# Altium PCB ASCII-v2.0.PcbDoc (part 5 of 5)
Units mil, origin at the board's own origin, x right, y up, seen from the top; angles counter-clockwise.
Board outline 1968.5 x 4921.26 mil, 4 copper layers (Top Layer, Layer 1, Layer 2, Bottom Layer), stack 62.45 mil thick; 272 components, 175 nets, 1155 pads, 394 vias.
Unrouted connection lines stored in the file: 146.
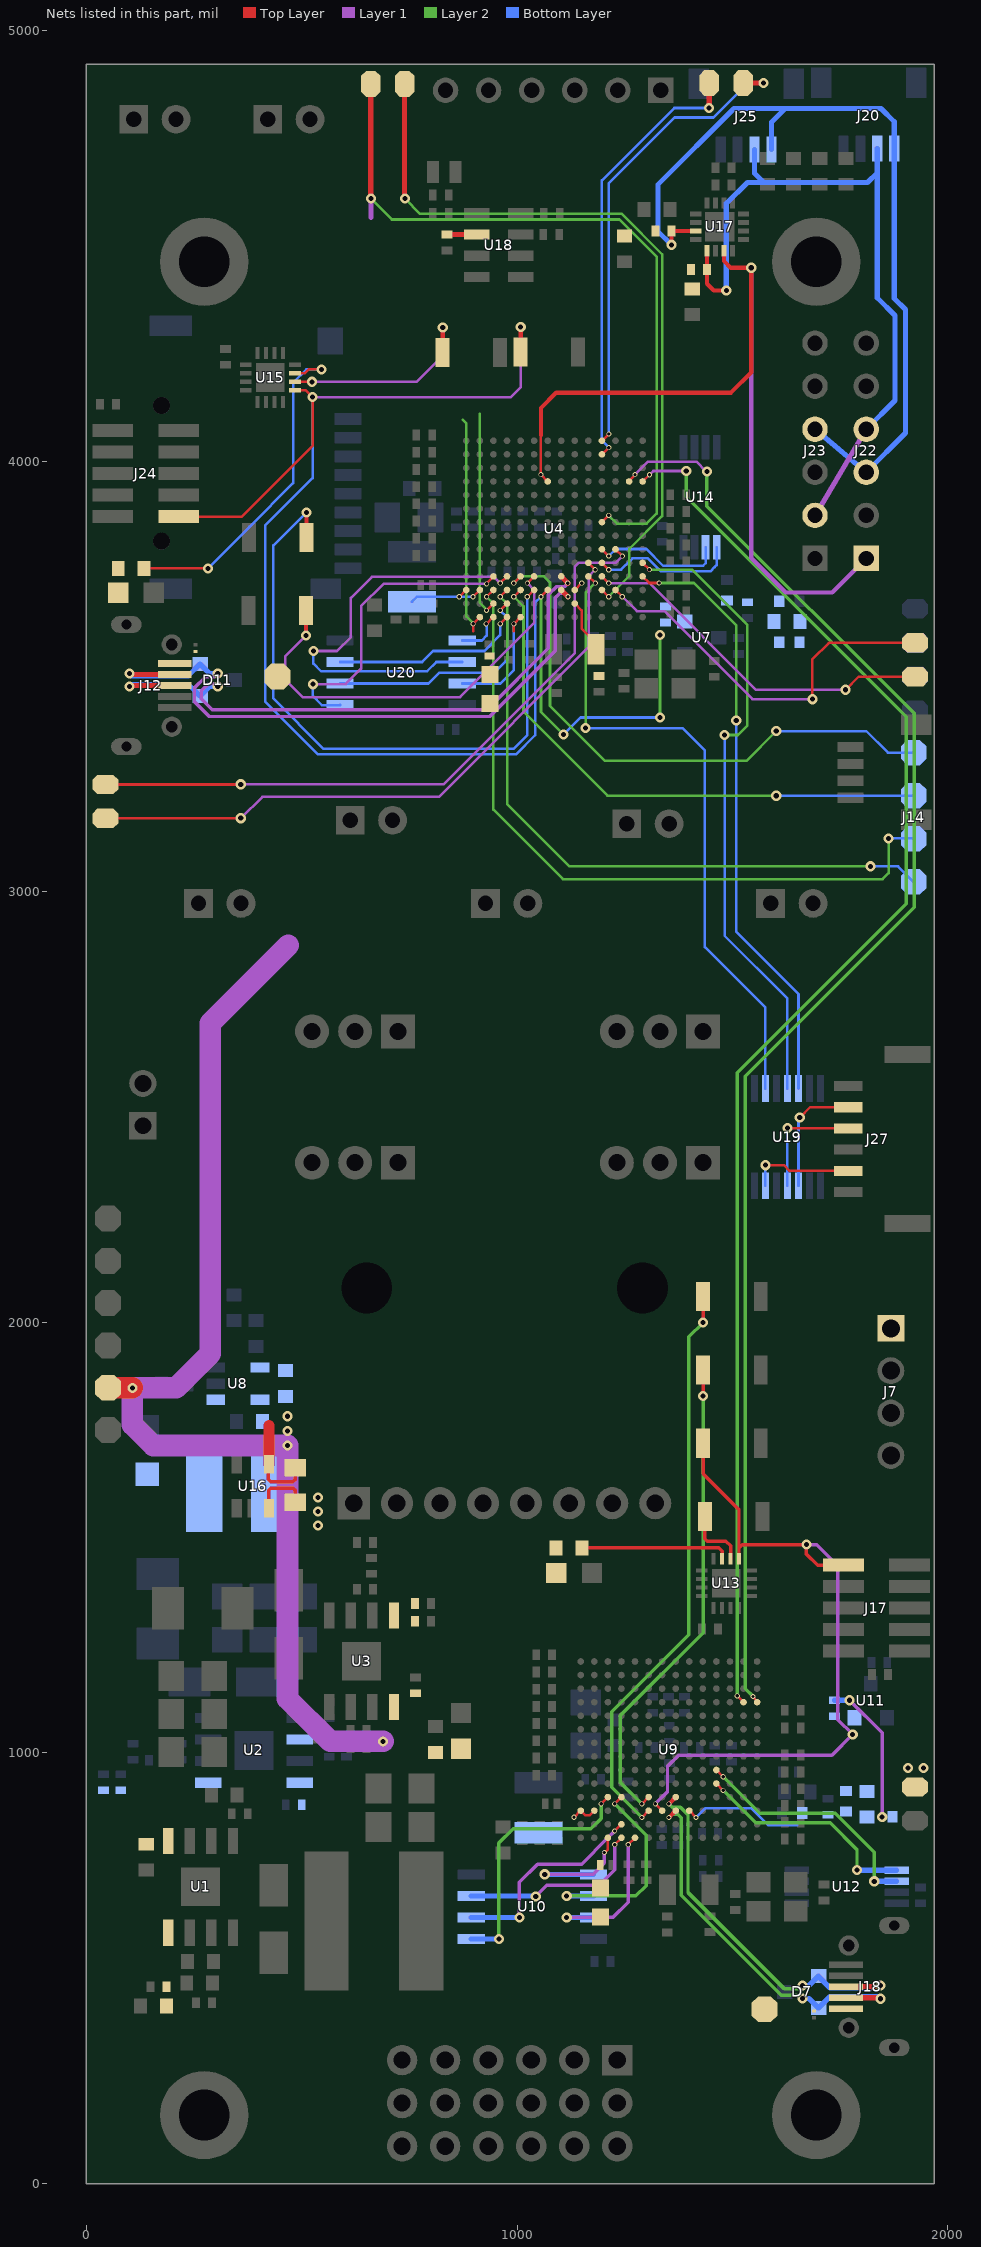
[diagram p5: the nets of this part, all layers, seen from the top]

## Via types
v1: diameter 23.62, hole 11.81, Top Layer to Bottom Layer, tented both sides, 119 vias
v2: diameter 23.62, hole 11.81, Top Layer to Bottom Layer, 104 vias
v3: diameter 11.81, hole 7.87, Top Layer to Bottom Layer, 89 vias
v4: diameter 11.81, hole 7.87, Top Layer to Bottom Layer, tented both sides, 82 vias

## Nets (pads, with @x,y where several pads share a name; then routed paths per layer and width w, separated by ;. In a path a pad name is that pad's centre, name@x,y a point inside that pad or via, vN(x,y) a via of type N, cw(c..) or ccw(c..) an arc to the next point about the centre after c; other vN are vias at no path point) (continued)
NetC125_1: C125.1 U4.N9 X4.1 | length 108.6
  Top Layer w6: U4.N9@1134.22,3669.27 1150,3653.48 1150,3611 X4.1@1181,3580
NetC134_2: C134.2 U18.2 | length 70.5
  Top Layer w12: C134.2@836.5,4527 C134.2@837.28,4526.22 U18.2@906.64,4526.22
NetD5_1: D5.1 L4.2 U8.1
NetF1_2: F1.2 FB1.1
NetF2_2: F2.2 FB3.1
NetL5_2: L5.2 U9.M1 U9.M2 | length 62.7
  Top Layer w6: v4(1132.28,850.69) 1132.48,850.69 1147.82,866.03 U9.M1@1148.02,866.03 1159.06,855 1168.49,855 U9.M2@1179.52,866.03
NetL6_2: L6.2 U4.M1 U4.M2 | length 191.9
  Top Layer w6: v3(865.87,3685.02) 866.19,3685.02 881.93,3700.76 U4.M1@882.25,3700.76 ; v3(897.68,3685.02) 897.84,3685.02 913.59,3700.76 U4.M2@913.74,3700.76
  Bottom Layer w6: L6.2@756.03,3673.65 767.4,3685.02 v3(897.68,3685.02)
NetLED1_1: LED1.1 R1.1
NetLED2_2: LED2.2 R26.2
NetLED3_2: LED3.2 R13.2
NetR2_1: R2.1 R5.2 U2.5
NetR4_2: R4.2 U2.4
NetR6_1: R6.1 R9.2 U3.5
NetR8_2: R8.2 U3.4
NetR13_1: R13.1 U15.11 | length 804.9
  Top Layer w6: R13.1@134,3751 v2(282,3751) ; U15.11@484.09,4203.84 506.84,4203.84 516,4213 v2(545.65,4213)
  Bottom Layer w6: v2(282,3751) 378.38,3847.38 480,3949 480,4182 511,4213 v2(545.65,4213)
NetR14_2: R14.2 SB2.2
NetR15_2: R15.2 SB3.2
NetR17_1: R17.1 R20.2 U1.5
NetR19_2: R19.2 U1.4
NetR26_1: R26.1 U13.11 | length 355.1
  Top Layer w8: R26.1@1150.66,1476 R26.1@1151.66,1477 ; R26.1@1150.66,1477 R26.1@1151.66,1477 ; R26.1@1156.66,1482 R26.1@1151.66,1477 ; U13.11@1476.16,1451.09 1476.16,1468.84 1468,1477 R26.1@1151.66,1477
NetR28_1: R28.1 U8.4
NetSW4_2: SW4.2 U13.10 | length 147.9
  Top Layer w8: SW4.2@1436.07,1549 1436.07,1506.07 1436.07,1497.93 1442,1492 1485,1492 1495.84,1481.16 U13.10@1495.84,1451.09
NetSW8_2: SW8.2 U15.10 | length 492.3
  Top Layer w6: U15.10@484.09,4184.16 v2(523.84,4184.16)
  Top Layer w10: SW8.2@827.57,4252.5 v2(827.57,4310.5)
  Layer 1 w6: v2(523.84,4184.16) 766.84,4184.16 827.57,4244.89 v2(827.57,4310.5)
NetU4_J11: U4.J11 U14.6 | length 309.5
  Top Layer w6: U4.J11@1197.21,3795.25 v3(1212.96,3779.59)
  Bottom Layer w6: v3(1212.96,3779.59) 1213.04,3779.59 1229.45,3796 1300.38,3796 1339.38,3757 1432,3757 1437.8,3762.8 U14.6@1437.8,3799.86
NetU4_K11: U4.K11 U14.5 | length 343.8
  Top Layer w6: U4.K11@1197.21,3763.76 1197.21,3763.61 1212.98,3747.84 v3(1212.98,3747.69)
  Bottom Layer w6: v3(1212.98,3747.69) 1213.3,3748.01 1242.01,3748.01 1268,3774 1304,3774 1334,3744 1449,3744 1459,3754 1463.39,3758.39 U14.5@1463.39,3799.86
NetU4_L3: U4.L3 U20.1 | length 709
  Top Layer w6: v3(929.49,3715.09) 929.49,3715.8 945.24,3731.55 U4.L3@945.24,3732.26
  Layer 1 w6: v2(526,3482) 602,3482 638,3518 638,3663 690.09,3715.09 v3(929.49,3715.09)
  Bottom Layer w6: v2(526,3482) 526,3454 546.52,3433.48 U20.1@589.1,3433.48 U20.1@589.62,3434
NetU4_L4: U4.L4 U20.6 | length 978.2
  Top Layer w6: v3(960.99,3716.51) U4.L4@976.74,3732.26
  Layer 1 w6: v2(527,3559) 582,3559 614,3591 614,3682.15 662.85,3731 946.5,3731 v3(960.99,3716.51)
  Bottom Layer w6: v2(527,3559) 527,3530 545,3512 574,3512 791,3512 812.48,3533.48 U20.6@872.96,3533.48
NetU4_N4: U4.N4 U20.2 | length 554.8
  Top Layer w6: v3(960.99,3653.52) U4.N4@976.74,3669.27
  Bottom Layer w6: U20.2@589.1,3483.48 794.48,3483.48 820,3509 948,3509 976.89,3537.89 976.89,3637.61 v3(960.99,3653.52)
NetU4_P3: U4.P3 U20.5 | length 112.6
  Top Layer w6: v3(928.28,3622.02) 928.89,3622.02 944.64,3637.77 U4.P3@945.24,3637.77
  Bottom Layer w6: U20.5@872.96,3583.48 918.48,3583.48 929.49,3594.49 929.49,3606.87 929.24,3607.12 929.24,3621.07 v3(928.28,3622.02)
NetU4_P4: U4.P4 U20.3 | length 446.1
  Top Layer w6: v3(960.99,3622.02) U4.P4@976.74,3637.77
  Bottom Layer w6: U20.3@589.1,3533.48 779.48,3533.48 805,3559 924,3559 960.99,3595.99 v3(960.99,3622.02)
NetU4_P5: U4.P5 U20.7 | length 279.4
  Top Layer w6: 992.48,3605.09 992.48,3621.71 v3(992.8,3622.02) ; v3@992.48,3622.02 U4.P5@1008.23,3637.77
  Bottom Layer w6: U20.7@872.96,3483.48 961.48,3483.48 992.48,3514.48 992.48,3621.71 v3(992.8,3622.02)
NetU9_J11: U9.J11 U12.6 | length 565.1
  Top Layer w6: U9.J11@1462.98,960.52 v4(1478.73,944.77)
  Layer 2 w8: v4(1478.73,944.77) 1563.5,860.01 1738.99,860.01 1829.5,769.5 v1(1829.5,702.01)
  Bottom Layer w12: v1(1829.5,702.01) U12.6@1881.5,702.01
NetU9_K11: U9.K11 U12.5 | length 529.8
  Top Layer w6: U9.K11@1462.98,929.02 v4(1478.73,913.28)
  Layer 2 w8: v4(1478.73,913.28) 1554.27,837.74 1727.26,837.74 1789.5,775.5 v1(1789.5,728.01)
  Bottom Layer w6: v1(1789.5,728.01) v1@1789.91,727.6
  Bottom Layer w12: v1@1789.91,727.6 U12.5@1881.5,727.6
NetU9_L3: U9.L3 U10.1 | length 604.5
  Top Layer w6: v4(1195.27,881.78) U9.L3@1211.02,897.53
  Layer 2 w8: v1(958,568) 958,791 991,824 1171.36,824 1195.27,847.9 v4(1195.27,881.78)
  Bottom Layer w12: U10.1@893.5,568.01 v1(958,568)
NetU9_L4: U9.L4 U10.6 | length 499
  Top Layer w6: v4(1226.76,881.78) U9.L4@1242.51,897.53
  Layer 2 w8: v1(1115.36,668.01) 1275.99,668.01 1300,692.02 1300,808.54 v4(1226.76,881.78)
  Bottom Layer w12: v1(1115.36,668.01) U10.6@1177.36,668.01
NetU9_N4: U9.N4 U10.2 | length 486.7
  Top Layer w6: v4(1226.76,818.79) U9.N4@1242.51,834.54
  Layer 1 w8: v1(1005.5,618.01) 1005.5,700.01 1047.5,742 1149.98,742 1209.98,802 v4(1226.76,818.79)
  Bottom Layer w12: U10.2@893.5,618.01 v1(1005.5,618.01)
NetU9_P3: U9.P3 U10.5 | length 325.1
  Top Layer w6: v4(1203,769) 1204,769 1211.02,776.02 U9.P3@1211.02,803.04
  Layer 1 w8: v1(1064.33,718.18) 1176.68,718.18 1203,744.5 v4(1203,769)
  Bottom Layer w12: v1(1064.33,718.18) 1064.5,718.01 U10.5@1177.36,718.01
NetU9_P4: U9.P4 U10.3 | length 439.8
  Top Layer w6: v4(1226.92,787.29) 1226.92,787.37 U9.P4@1242.51,803.04 U9.P4@1242.51,803.04
  Layer 1 w8: v1(1043.5,667.01) 1069.5,693.01 1190.5,693.01 1226.76,729.27 1226.76,787.13 v4(1226.92,787.29)
  Bottom Layer w12: U10.3@893.5,668.01 1042.5,668.01 v1(1043.5,667.01)
NetU9_P5: U9.P5 U10.7 | length 375.5
  Top Layer w6: v4(1258.26,787.29) U9.P5@1274.01,803.04
  Layer 1 w8: v1(1115.36,618.01) 1222.5,618.01 1258.26,653.76 v4(1258.26,787.29)
  Bottom Layer w12: v1(1115.36,618.01) U10.7@1177.36,618.01
ON/OFF: SW1.1 U9.M6 | length 1348.6
  Top Layer w6: v4(1289.76,850.28) U9.M6@1305.5,866.03
  Top Layer w8: v1@1432.07,1999.4 SW1.1@1432.07,2060
  Layer 2 w8: v4(1289.76,850.28) 1220,920.04 1220,1095.28 1399,1274.28 1399,1966.33 v1(1432,1999.33)
ON/OFF_1: SW5.1 U4.M6 | length 1517.2
  Top Layer w6: v3(1023.82,3685.02) 1023.9,3685.02 1039.65,3700.76 U4.M6@1039.73,3700.76
  Top Layer w10: SW5.1@511,3823 v2(511,3881)
  Bottom Layer w6: v2(511,3881) 434,3804 434,3449 551,3332 992.23,3332 1023.98,3363.75 1023.98,3684.86 v3(1023.82,3685.02)
RST_MCU: J17.10 R23.2 SW3.1 U9.M7 U11.2 U13.9 | length 1662.8
  Top Layer w6: v4(1321.25,881.78) U9.M7@1337,866.03
  Top Layer w8: SW3.1@1432.07,1719.33 1432.07,1647.93 1515.53,1564.47 1515.53,1476.53 ; U13.9@1515.53,1451.09 1515.53,1476.53 ; J17.10@1757.96,1436.51 1757.45,1436 1698,1436 1672,1462 v1(1672,1484) 1523,1484 1515.53,1476.53
  Layer 1 w8: v4(1321.25,881.78) 1349.5,910.03 1349.5,969.01 1375.51,995.02 1731.51,995.02 v1(1779.5,1043.01) 1745,1077.51 1745,1435 1696,1484 v1(1672,1484)
RST_MCU_1: J24.10 R10.2 SW7.1 U4.M7 U7.2 U15.9 | length 3802.4
  Top Layer w6: J24.10@214.77,3871 361,3871 525.26,4035.26 v2(525.26,4148.74) 509.53,4164.47 U15.9@484.09,4164.47 ; v3(1055.63,3685.02) 1055.63,3685.09 1071.22,3700.69 U4.M7@1071.22,3700.76
  Top Layer w10: SW7.1@1008.5,4253.5 v2(1008.5,4311.5)
  Layer 1 w6: v2(525.26,4148.74) 985.74,4148.74 1009,4172 v2@1009,4311.5
  Layer 2 w6: v3(1055.63,3685.02) 1055.63,3417.37 v2(1108,3365) ; v2(1332,3404.54) v2(1332,3596)
  Bottom Layer w6: v2(525.26,4148.74) 525.26,3960.26 415,3850 415,3442 538,3319 997.62,3319 1042,3363.38 1042,3671.54 1055.48,3685.02 v3(1055.63,3685.02) ; v2(1108,3365) 1147.54,3404.54 v2(1332,3404.54)
RTS: U4.L10 U19.2 | length 1511.2
  Top Layer w6: U4.L10@1165.71,3732.26 1166.03,3732.26 1181.78,3716.51 v3(1182.09,3716.51)
  Layer 2 w6: v2(1159,3380) 1160,3381 1160,3695.05 1181.46,3716.51 v3(1182.09,3716.51)
  Bottom Layer w6: v2(1159,3380) 1384,3380 1436,3328 1436,2871.62 1576.82,2730.8 U19.2@1576.82,2542.99
RTS_5V: J27.2 U19.13 | length 245.6
  Top Layer w6: v2(1577,2365) 1620,2365 1633.14,2351.86 J27.2@1769.04,2351.86
  Bottom Layer w6: U19.13@1576.82,2317.01 1576.82,2364.82 v2(1577,2365)
RX: U4.L14 U19.5 | length 1400.1
  Top Layer w6: U4.L14@1291.7,3732.26 1291.93,3732.26 1307.21,3716.98 v3(1330,3717)
  Layer 2 w6: v3(1330,3717) 1411,3717 1509,3619 v2(1509,3398)
  Bottom Layer w6: v2(1509,3398) 1509,2907.19 1653.59,2762.6 U19.5@1653.59,2542.99
RX0: U4.D14 U9.D13 | length 3350.2
  Top Layer w6: U4.D14@1291.7,3952.73 1291.93,3952.73 1307.53,3968.33 v3(1307.76,3968.33) ; v4(1511.47,1132.5) U9.D13@1525.98,1118
  Layer 1 w6: v3(1307.76,3968.33) 1316.43,3977 v2(1393,3977)
  Layer 2 w8: v2(1393,3977) 1393,3916.8 1903.47,3406.33 1903.47,2971.67 1511.47,2579.67 v4(1511.47,1132.5)
RX1: TP11.2 U4.G11 | length 1776.5
  Top Layer w6: U4.G11@1197.21,3858.24 v3(1212.96,3873.99)
  Top Layer w12: v1@660.26,4609.5 TP11.2@660.26,4876
  Layer 1 w12: 660.76,4566.24 v1(660.76,4609.5)
  Layer 2 w6: v1(660.76,4609.5) 709.26,4561 1238,4561 1324,4475 1324,3877.88 1301.12,3855 1231.95,3855 v3(1212.96,3873.99)
RX1_5V: J27.5 U19.10 | length 280.9
  Top Layer w6: v2(1656.59,2475.59) 1680.5,2499.5 J27.5@1769.04,2499.5
  Bottom Layer w6: U19.10@1653.59,2317.01 v2@1653.59,2475.59
RX2: TP12.2 U4.M12 | length 909.3
  Top Layer w6: U4.M12@1228.7,3700.76 v3(1244.45,3685.02) ; v2(1686,3447.19) 1686,3540 1724,3578 TP12.2@1924.44,3578
  Layer 1 w6: v3(1244.45,3685.02) 1278.07,3651.4 1342.6,3651.4 1546.81,3447.19 v2(1686,3447.19)
RX3: TP13.2 U4.K10 | length 1495.4
  Top Layer w6: TP13.2@44,3170.26 358,3170.26 v2(358.5,3170.76) ; U4.K10@1165.71,3763.76 1165.71,3763.6 1181.46,3747.85 v3(1181.46,3747.69)
  Layer 1 w6: v2(358.5,3170.76) 358.94,3170.76 408.68,3220.5 818.41,3220.5 1166.18,3568.28 1166.18,3691.92 1166.18,3732.42 v3(1181.46,3747.69)
RX4: TP1.2 U4.B11 | length 1026.3
  Top Layer w6: U4.B11@1197.21,4015.72 1197.37,4015.72 1213.11,4031.47 v3(1213.27,4031.47) ; v2(1446,4820) v2@1446.26,4820.26
  Top Layer w12: v2@1446.26,4820.26 TP1.2@1446.26,4878
  Bottom Layer w6: v3(1213.27,4031.47) 1197.05,4047.69 1197.05,4339.39 1197.05,4651.62 1365.43,4820 v2(1446,4820)
S+: J7.1 R16.2 U16.3 | length 134.1
  Top Layer w8: U16.3@423.9,1568.32 423.9,1609.81 428.59,1614.5 480.5,1614.5 485.5,1609.5 R16.2@485.5,1582.5
  other v1: 538,1528 538,1560.5 538,1593
S-: C5.2 C6.2 C29.2 L4.1 R16.1 R28.2 TP4.1 U2.2 U8.5 U16.4 | length 2831.4
  Top Layer w8: U16.4@423.9,1670.68 422.5,1669.28 422.5,1635.5 428.5,1629.5 479.5,1629.5 485.5,1635.5 R16.1@485.5,1662.5
  Top Layer w25: U16.4@423.9,1670.68 423.9,1760.29
  Top Layer w50: TP4.1@50,1848.2 v1@106.6,1848.2
  Layer 1 w50: 469,2876 288,2695 288,1927 208.8,1847.8 v1(107,1847.8) 107,1762 155,1714 v1(467,1714) 467,1126 566,1027 v1(689,1027)
  other v1: 467,1748 467,1782
SCL: J20.4 J22.3 J23.4 J25.4 R14.1 U4.P2 U17.3 | length 2526
  Top Layer w6: 898,3605.09 v3(898,3622.02) U4.P2@913.74,3637.77
  Top Layer w10: v2(1358.69,4502.31) R14.1@1358.69,4534.31 U17.3@1415.17,4534.31
  Layer 2 w6: 874,4096 881.78,4088.22 881.78,3678.43 882.41,3677.8 882.41,3639.19 898,3623.6 v3(898,3622.02)
  Bottom Layer w12: v2(1358.69,4502.31) 1327,4534 1327,4642 1504,4819 1623,4819 ; J25.4@1591.06,4723.74 1591.06,4787.06 1623,4819 ; J23.4@1692,4074 J22.3@1811,3974 1902,4065 1902,4352 1876.07,4377.93 J20.4@1876.07,4725.72 1876.07,4787.93 1845,4819 1623,4819
SDA: J20.3 J22.4 J23.2 J25.3 R15.1 U4.N3 U17.5 | length 2211.5
  Top Layer w6: v3(929.18,3653.52) 929.33,3653.52 945.08,3669.27 U4.N3@945.24,3669.27
  Top Layer w10: U17.5@1441.06,4488.74 1441.06,4411.94 1457,4396 v2(1486,4396)
  Layer 1 w12: J23.2@1692,3874 J22.4@1811,4074
  Layer 2 w6: 913.59,4110.37 913.59,3670.68 929.18,3655.09 v3(929.18,3653.52)
  Bottom Layer w12: v2(1486,4396) 1486,4598 1535,4647 1573,4647 ; J25.3@1551.68,4723.74 1551.68,4668.32 1573,4647 ; J22.4@1811,4074 1878,4141 1878,4338 1836.7,4379.3 1836.7,4669.7 ; J20.3@1836.7,4725.72 1836.7,4669.7 ; 1573,4647 1814,4647 1836.7,4669.7
SPI_PCS0: J14.4 U4.M4 | length 1528.9
  Top Layer w6: v3(960.99,3685.02) U4.M4@976.74,3700.76
  Layer 2 w6: v3(960.99,3685.02) 976.89,3669.11 976.89,3204.11 1122,3059 v2(1821,3059)
  Bottom Layer w6: v2(1821,3059) 1885,3059 J14.4@1921,3023
SPI_SCK: J14.1 U4.L5 | length 1353.2
  Top Layer w6: v3(992.48,3716.51) U4.L5@1008.23,3732.26
  Layer 2 w6: v3(992.48,3716.51) 1002.7,3726.72 1008.39,3732.42 1062.58,3732.42 1076.58,3718.42 1076.58,3431.57 1204.15,3304 1533,3304 v2(1602,3373)
  Bottom Layer w6: v2@1601,3373 v2(1602,3373) 1811,3373 1861,3323 J14.1@1921,3323
SPI_SIN: J14.3 U4.M3 | length 1653.4
  Top Layer w6: v3(929.49,3685.02) U4.M3@945.24,3700.76
  Layer 2 w6: v3(929.49,3685.02) 945.08,3669.43 945.08,3190.93 1106.82,3029.19 1849.19,3029.19 1863,3043 v2(1863,3124)
  Bottom Layer w6: v2(1863,3124) 1918.76,3124 1919.38,3124.62 J14.3@1921,3123
SPI_SOUT: J14.2 U4.M5 | length 1285.4
  Top Layer w6: v3(992.48,3685.02) U4.M5@1008.23,3700.76
  Layer 2 w6: v3(992.48,3685.02) 1015,3662.5 1015,3418 1210,3223 v2(1602,3223)
  Bottom Layer w6: v2(1602,3223) J14.2@1921,3223
TRIG: J22.1 U4.D7 U17.7 | length 2044
  Top Layer w6: 1055.48,4060 v3(1055.48,3968.48) U4.D7@1071.22,3952.73
  Top Layer w10: 1055.48,4060 1055.48,4076.52 1055.48,4123.48 1091,4159 1497,4159 1544,4206 v2(1544,4449) 1496,4449 1480.43,4464.57 U17.7@1480.43,4488.74
  Layer 1 w10: v2(1544,4449) 1544,3775 1624,3695 1732,3695 J22.1@1811,3774
TX: U4.K14 U19.4 | length 1479.5
  Top Layer w6: U4.K14@1291.7,3763.76 v3(1307.44,3748.01)
  Layer 2 w6: v3(1307.44,3748.01) 1405.99,3748.01 1534.81,3619.19 1534.81,3408.48 1534.81,3385.81 1513,3364 v2(1482,3364)
  Bottom Layer w6: v2@1482.38,3364 1482.38,2897.62 1628,2752 U19.4@1628,2542.99
TX0: U4.D13 U9.D14 | length 3441.6
  Top Layer w6: U4.D13@1260.2,3952.73 1260.2,3953.66 1274.09,3967.55 v3(1274.09,3968.48) ; v4(1547.91,1131.27) 1547.91,1129.7 1557.47,1120.13 U9.D14@1557.47,1118
  Layer 1 w6: v3(1274.09,3968.48) 1304.43,3998.81 1402.03,3998.81 1416.6,3998.81 1439,3976.41 v2@1441,3976.41
  Layer 2 w8: v2@1441,3976.41 v2(1441,3976) 1441,3895 1922,3414 1922,2964 1530,2572 1530,1149.18 v4(1547.91,1131.27)
TX1: TP11.1 U4.M11 | length 1786.5
  Top Layer w6: U4.M11@1197.21,3700.76 v3(1212.96,3685.02)
  Top Layer w12: v1@739,4609.5 TP11.1@739,4876
  Layer 2 w6: v1(739.5,4609.5) 775,4574 1243.38,4574 1337,4480.38 1337,4105.96 1337,3872.49 1260.63,3796.12 1260.63,3732.69 v3(1212.96,3685.02)
TX1_5V: J27.4 U19.11 | length 275.3
  Top Layer w6: v2(1628,2451) 1628.71,2450.29 J27.4@1769.04,2450.29
  Bottom Layer w6: U19.11@1628,2317.01 v2(1628,2451)
TX2: TP12.1 U4.L11 | length 848.8
  Top Layer w6: U4.L11@1197.21,3732.26 v3(1212.96,3716.51) ; v2(1763,3469) 1793.26,3499.26 TP12.1@1924.44,3499.26
  Layer 1 w6: v3(1212.96,3716.51) 1307.78,3716.51 1555.29,3469 v2(1763,3469)
TX3: TP13.1 U4.J12 | length 1560.2
  Top Layer w6: TP13.1@44,3249 358,3249 v2(358.5,3249.5) ; U4.J12@1228.7,3795.25 v3(1244.73,3779.23)
  Layer 1 w6: v2(358.5,3249.5) 829.02,3249.5 1134.37,3554.85 1134.37,3691.6 1134.37,3754.91 1143.15,3763.68 1229.18,3763.68 v3(1244.73,3779.23)
TX4: TP1.1 U4.A11 | length 1107.2
  Top Layer w6: U4.A11@1197.21,4047.22 1197.33,4047.22 1213.07,4062.97 v3(1213.19,4062.97)
  Top Layer w12: TP1.1@1525,4878 v2(1572,4878)
  Bottom Layer w6: v3(1213.19,4062.97) 1212.96,4063.2 1212.96,4644.96 1365.93,4797.93 1455.93,4797.93 1536,4878 v2(1572,4878)
USB1_D_N: D7.2 J18.2 U9.M8 | length 905.5
  Top Layer w10: v4(1352.75,850.28) U9.M8@1368.5,866.03
  Top Layer w12: J18.2@1763.6,431.68 1844,431.68 v1(1844,429.17)
  Layer 2 w8: v4(1352.75,850.28) 1360.5,858.03 1373,858.03 1381,850.03 1381,669.37 1613.37,437 1655.69,437 v1(1663,429.69)
  Bottom Layer w12: v1(1663,429.69) 1678.28,429.69 D7.2@1700.37,407.6 1700.37,407.85 1727,434.48 1838.69,434.48 v1(1844,429.17)
USB1_D_P: D7.1 J18.3 U9.L8 | length 906.6
  Top Layer w10: v4(1352.75,881.78) U9.L8@1368.5,897.53
  Top Layer w12: J18.3@1763.6,457.27 1844,457.27 v1(1844,459.79)
  Layer 2 w8: v4(1352.75,881.78) 1360.5,874.03 1379.63,874.03 1397,856.66 1397,676 1620,453 1655.69,453 v1(1663,460.31)
  Bottom Layer w12: v1(1663,460.31) 1678.28,460.31 D7.1@1700.37,482.4 1700.37,481.11 1727,454.48 1838.69,454.48 v1(1844,459.79)
USB1_VBUS: D3.2 F2.1 J12.1 TP14.1
USB2_D_N: D11.2 J12.2 U4.M8 | length 1531.9
  Top Layer w12: v2(100,3506.86) 102.52,3504.34 J12.2@205.2,3504.34 ; U4.M8@1102.72,3700.76 v3(1118.47,3685.02)
  Layer 1 w8: v2(305,3506.91) 297.69,3499.6 277.37,3499.6 251,3473.23 251,3441.37 285.37,3407 937,3407 1089,3559 1089,3683 1098.76,3692.76 1110.72,3692.76 v3(1118.47,3685.02)
  Bottom Layer w12: v2(100,3506.86) 105.31,3501.55 143,3501.55 ; 143,3501.6 236.6,3501.6 D11.2@264,3529 286.09,3506.91 v2(305,3506.91)
USB2_D_P: D11.1 J12.3 U4.L8 | length 1478.3
  Top Layer w12: v2(100,3476.23) 102.52,3478.75 J12.3@205.2,3478.75 ; U4.L8@1102.72,3732.26 1117.84,3717.14 v3(1117.84,3716.51)
  Layer 1 w8: v2(305,3476.29) 297.69,3483.6 284,3483.6 267,3466.6 267,3448 292,3423 930.37,3423 1073,3565.63 1073,3689.63 1092.14,3708.76 1110.59,3708.76 1117.84,3716.01 v3(1117.84,3716.51)
  Bottom Layer w12: v2(100,3476.23) 105.31,3481.55 143,3481.55 ; 143,3481.6 236.6,3481.6 D11.1@264,3454.2 286.09,3476.29 v2(305,3476.29)
USB_VBUS: D6.2 F1.1 J18.1 TP9.1
V1_RTC: D13.1 R12.1 TP15.1
V_RTC: D9.1 R25.1 TP2.1
  other v1: 1908,965 1944,965
VDD1_SNVS: C75.2 D8.2 D9.2 D10.2 R23.1 R25.2 U9.M9 | length 620.1
  Top Layer w6: U9.M9@1399.99,866.03 v4(1415.74,850.28)
  Layer 1 w8: v1(1772,1122.51) 1848,1046.51 v1(1848,851)
  Bottom Layer w6: v4(1415.74,850.28) 1437.46,872.01 1543.5,872.01 1583.5,832.01 1650.5,832.01
  Bottom Layer w12: R23.1@1737.5,1122.51 v1(1772,1122.51)
VDD_SNVS: C123.2 D12.2 D13.2 D14.2 R10.1 R12.2 U4.M9 | length 22.6
  Top Layer w6: U4.M9@1134.22,3700.76 1134.37,3700.76 1150.12,3716.51 v3(1150.28,3716.51)
WAKE_UP: SW2.1 U9.L6 | length 1129.4
  Top Layer w6: v4(1289.76,881.78) U9.L6@1305.5,897.53
  Top Layer w8: v1(1432,1829) 1432.07,1829.07 SW2.1@1432.07,1889.67
  Layer 2 w8: v4(1289.76,881.78) 1240,931.54 1240,1087 1432,1279 v1@1432,1828.05
WAKE_UP_1: SW6.1 U4.L6 | length 967.9
  Top Layer w6: v3(1023.98,3716.51) U4.L6@1039.73,3732.26
  Top Layer w10: v2(509.93,3595) SW6.1@509.93,3653
  Layer 1 w6: v2(509.93,3595) 462,3547.07 462,3492 502,3452 868,3452 1039.73,3623.73 1039.73,3700.76 v3(1023.98,3716.51)
pads on no net: J12.4 J15. J15.9 J17.7 J18.4 J20.MP1 J20.MP2 J21.MP1 J21.MP2 J24.7 J25.MP1 J25.MP2 J27.MP1 J27.MP2 U2.3 U3.3 U4.A2 U4.A3 U4.A4 U4.A5 U4.A6 U4.A7 U4.A9 U4.A10 U4.A12 U4.A13 U4.B1 U4.B2 U4.B3 U4.B4 U4.B6 U4.B7 U4.B9 U4.B12 U4.B13 U4.B14 U4.C1 U4.C2 U4.C3 U4.C4 U4.C5 U4.C6 U4.C7 U4.C9 U4.C10 U4.C11 U4.C12 U4.C13 U4.C14 U4.D1 U4.D2 U4.D3 U4.D4 U4.D5 U4.D6 U4.D9 U4.D11 U4.D12 U4.E1 U4.E3 U4.E4 U4.E5 U4.E10 U4.E11 U4.E12 U4.F1 U4.F2 U4.F4 U4.G1 U4.G2 U4.G3 U4.G4 U4.G5 U4.G12 U4.G14 U4.H1 U4.H3 U4.H4 U4.H5 U4.H11 U4.H12 U4.H13 U4.J13 U4.J14 U4.K7 U4.K12 U4.L7 U4.L12 U4.L13 U4.M13 U4.N7 U4.N10 U4.N12 U4.N13 U4.P7 U4.P13 U6. U6.5 U6.6 U6.7 U6.8 U9.A2 U9.A3 U9.A6 U9.A7 U9.A8 U9.A9 U9.A12 U9.A13 U9.B1 U9.B2 U9.B3 U9.B4 U9.B6 U9.B7 U9.B8 U9.B9 U9.B12 U9.B13 U9.B14 U9.C1 U9.C2 U9.C3 U9.C4 U9.C5 U9.C6 U9.C7 U9.C8 U9.C9 U9.C10 U9.C11 U9.C12 U9.C13 U9.C14 U9.D1 U9.D2 U9.D3 U9.D4 U9.D5 U9.D6 U9.D7 U9.D8 U9.D11 U9.D12 U9.E1 U9.E3 U9.E4 U9.E5 U9.E7 U9.E8 U9.E10 U9.E11 U9.E12 U9.F1 U9.F2 U9.F4 U9.G1 U9.G2 U9.G3 U9.G4 U9.G5 U9.G12 U9.G14 U9.H1 U9.H2 U9.H3 U9.H4 U9.H5 U9.H10 U9.H11 U9.H12 U9.H14 U9.J1 U9.J2 U9.J3 U9.J4 U9.J14 U9.K1 U9.K12 U9.L5 U9.L7 U9.L10 U9.L11 U9.L12 U9.M3 U9.M4 U9.M5 U9.M13 U9.M14 U9.N3 U9.N7 U9.N10 U9.N12 U9.N13 U9.P2 U9.P7 U9.P13 U13.14 U13.16 U15.14 U15.16 U17.4 U17.9 U17.10 U17.14 U17.16 U19.6 U19.9

## Polygon pours and split planes (outlines as drawn)
USB1_VBUS on Top Layer "USB1_VBUS_L01_P039" (solid, pour order 39): 166.32,3517.95 382,3517.95 382,3413 956.25,3413 956.25,3489 660,3489 660,3565.87 244,3565.87 244,3547 165,3547
5V on Top Layer "5V_L01_P018" (solid, remove dead copper, pour order 18): 418,2531 418,2198 11,2198 11,2503 202,2503 202,2805.5 744,2805.5 744,3071 1025,3071 1812,3071 1812,2531
GND on Top Layer "NONET_L01_P032" (solid, remove dead copper, shelved, pour order 32): 0,0 0,4921.26 1968.5,4921.26 1968.5,0
3V3 on Top Layer "3V3_L01_P027" (solid, remove dead copper, pour order 27): 1461,1351 1461,1317 1438,1317 1438,1274 1361,1274 1361,1351
USB_VBUS on Top Layer "USB_VBUS_L01_P023" (solid, pour order 23): 1235,415 1235,641 1168,641 1168,366 1612,366 1612,395 1803,395 1803,415 1703.37,415
NetC107_2 on Bottom Layer "NETC107_2_L04_P036" (solid, remove dead copper, pour order 36): 1104,3761 1104,3870 836,3870 836,3761 695,3761 695,3831 767,3831 767,3965 1161,3965 1161,3761
NetC121_2 on Bottom Layer "NETC121_2_L04_P037" (solid, remove dead copper, pour order 37): 1129.5,3757.95 1129.5,3726.73 1110,3726.73 1110,3710 1031.85,3710 1031.85,3757.95
3V3 on Bottom Layer "3V3_L04_P038" (solid, remove dead copper, pour order 38): 1395.25,3828.01 1319,3828.01 1319,3790 1341,3768 1395.25,3768
3V3 on Bottom Layer "3V3_L04_P025" (solid, remove dead copper, pour order 25): 1390,3032 500,3032 500,3260.36 1390,3260.36
S+ on Bottom Layer "S+_L04_P024" (solid, remove dead copper, pour order 24): 506,1994 506,1514 569,1514 569,1694 1844,1694 1844,2027 1959,2027 1959,2222 1683,2222 1683,1994
GND on Bottom Layer "NONET_L04_P022" (solid, remove dead copper, shelved, pour order 22): 0,0 0,4921.26 1968.5,4921.26 1968.5,0
3V3 on Bottom Layer "3V3_L04_P021" (solid, remove dead copper, pour order 21): 1196.5,491 1196.5,551 1223,551 1223,589 1111,589 1111,491
12V on Bottom Layer "12V_L04_P020" (solid, remove dead copper, pour order 20): 10.19,2091 363,2091 363,2029 203,2029 203,1706 10.19,1706
8V4 on Bottom Layer "8V4_L04_P019" (solid, remove dead copper, pour order 19): 1527,2464 317,2464 317,3106 9,3106 9,2102 1527,2102
NetC61_2 on Bottom Layer "NETC61_2_L04_P003" (solid, remove dead copper, pour order 3): 1279.5,1048.01 1279.5,1111.01 1436.5,1111.01 1436.5,996.01 1520.87,996.01 1520.87,962.01 1407.87,962.01 1407.87,1019.01 1406.5,1019.01 1406.5,1048.01 1294.5,1048.01 1294.5,964.01 1376.37,964.01 1376.37,921.15 1235.5,921.15 1235.5,973.01 1108.5,973.01 1108.5,904.01 985.5,904.01 985.5,1048.01
5V on Layer 2 "5V_L03_P031" (solid, remove dead copper, pour order 31): 589,4911.06 589,4506 849,4506 849,3212 320,3212 320,4911.06
3V3 on Layer 2 "NONET_L03_P033" (solid, remove dead copper, shelved, pour order 33): 311,350 1968.5,350 1968.5,4921.26 311,4921.26
12V on Layer 2 "12V_L03_P030" (solid, remove dead copper, pour order 30): 164,1908 164,2204 312,2204 312,4913 11,4913 11,1908
5V on Layer 2 "5V_L03_P029" (solid, remove dead copper, pour order 29): 782.11,885 782.11,1463 836,1463 836,338 1955,338 1955,19 0,19 0,885
8V4 on Layer 2 "8V4_L03_P026" (solid, remove dead copper, pour order 26): 0,1464 0,1894 175,1894 175,2190 302,2190 302,1464 772,1464 774,1467 774,898 0,898
GND on Layer 1 "NONET_L02_P035" (solid, shelved, pour order 35): 0,0 0,4921.26 1968.5,4921.26 1968.5,0

## Other copper
Top Layer:
  rectangle net S-: 411,1642 522,1808
  rectangle net 3V3: 13,4055 109,4097
  rectangle net 3V3: 13,4055 50,4151
  rectangle net NetLED3_2: 50,3667 98,3768
  rectangle net NetR15_2: 1389,4380 1425,4463
  rectangle net 3V3: 830,4561 938,4727
  rectangle net 3V3: 1494,4473 1530,4502
  rectangle net NetR14_2: 1230,4505 1331,4549
  rectangle net A0: 1563,4627 1661,4658
  rectangle net A1: 1680,4609 1790,4661
  rectangle net NetC119_1: 1230,3448 1328,3492
  rectangle net NetC118_1: 1359,3516 1475,3567
  rectangle net NetC125_1: 1162.43,3488 1203.43,3599
  rectangle net NetC124_1: 1065.25,3488 1107,3599
  rectangle net NetF2_2: 916,3483 957,3557
  rectangle net NetC18_2: 920,3565 1041,3589
  rectangle net NetC102_2: 642,3651 819.44,3687
  region net NetC102_2: 819.44,3725 795.44,3725 795.44,3651 819.44,3651
  rectangle net 3V3: 760,3699 784,3758
  rectangle net 3V3: 760,3738 820.25,3758
  region net 3V3: 820.25,4107.77 791.76,4107.77 791.76,3738 820.25,3738
  region net 3V3: 1373,3969 1344.5,3969 1344.5,3633.74 1373,3633.74
  region net NetR8_2: 700,1157 700,1076 730,1076 730,1157
  rectangle net S+: 411,1515 551,1604
  region net 3V3: 392.42,1695.29 254,1695.29 254,1637.5 392.42,1637.5
  rectangle net NetC1_1: 328,442.12 602,614
  rectangle net NetLED1_1: 787,985 895,1033
  rectangle net 5V: 120,888 305.11,920.12
  region net NetR6_1: 775,1286 775,1365 695,1365 695,1286
  region net NetC16_2: 680,1286 680,1425 645,1425 645,1286
  region net NetC12_2: 577,1019 577,1138 548,1138 548,1019
  rectangle net 8V4: 602,937 626,1140
  region net NetC12_1: 577,1287 577,1485 301,1485 301,1287
  region net NetC17_2: 680,1444 680,1505 645,1505 645,1444
  rectangle net NetR8_2: 700,1127 780,1157
  region net GND: 784,1165 784,1272 418,1272 418,1165
  region net 5V: 242,888 242,1388 120,1388 120,888
  region net NetC73_1: 1588.5,656.01 1492.5,656.01 1492.5,608.01 1588.5,608.01
  region net NetC72_1: 1729.5,726.01 1618.5,726.01 1618.5,675.01 1729.5,675.01
  region net NetC30_2: 1314.5,758.02 1211.5,758.02 1211.5,726.01 1314.5,726.01
  region net NetF1_2: 1201.5,752.01 1171.5,752.01 1171.5,666.01 1201.5,666.01
  region net NetF1_2: 1214.5,706.01 1171.5,706.01 1171.5,666.01 1214.5,666.01
  region net NetC77_1: 1468.5,718.01 1427.5,718.01 1427.5,611.01 1468.5,611.01
  region net NetC76_1: 1369.28,718 1328.28,718 1328.28,611 1369.28,611
  region net 3V3: 1075.5,923.01 830,923.01 830,863.01 1075.5,863.01
  region net NetC56_2: 1106.5,845.01 943.5,845.01 943.5,812.01 1106.5,812.01
  region net NetC56_2: 1106.5,900.02 1083.5,900.02 1083.5,812.01 1106.5,812.01
  region net 3V3: 1097.5,1268 1062.5,1268 1062.5,908.01 1097.5,908.01
  region net 3V3: 1637.5,1143 1603.5,1143 1603.5,777.01 1637.5,777.01
  region net 3V3: 914,958 727.11,958 727.11,437.12 914,437.12
  region net GND: 117.11,751.12 117.11,630.12 473.11,630.12 473.11,751.12
  region net NetC25_2: 315,486 275,486 275,404 315,404
  region net NetC1_1: 612.11,782.12 492.11,782.12 492.11,442.12 612.11,442.12
  region net NetC1_2: 352.11,872.12 322.11,872.12 322.11,762.12 352.11,762.12
  region net 5V: 305.11,920.12 274.11,920.12 274.11,764.12 305.11,764.12
  region net NetC24_2: 257.11,617.12 212.11,617.12 212.11,447.12 257.11,447.12
  region net NetR17_1: 202.11,617.12 167.11,617.12 167.11,392 202.11,392
  region net NetR19_2: 202.11,832.12 117.11,832.12 117.11,762.12 202.11,762.12
  rectangle net GND: 1888,770.99 1958,869.26
  region net V_RTC: 1960,981 1890,981 1890,894 1960,894
  region net 3V3: 1964.5,1251.01 1851.5,1251.01 1851.5,1161 1964.5,1161
  region net NetLED2_2: 1116.66,1388 1116.66,1495 1065.66,1495 1065.66,1388
  pour cut-out: 394,1440 394,1233 150,1233 150,1440
  pour cut-out: 505.93,777.01 505.93,442.12 867,442.12 867,777.01
Layer 1:
  rectangle net S-: 441,1686.5 492,1803.5
Bottom Layer:
  rectangle net 3V3: 1427,3592.76 1453,3644
  rectangle net NetC81_2: 1166,3582 1197.37,3628.41
  rectangle net NetC81_2: 1166,3582 1233,3605
  rectangle net 3V3: 1427,3573 1532,3614
  rectangle net RST_MCU_1: 1319,3580 1408,3643.6
  rectangle net K3_1: 923,3730 950,3760
  rectangle net VDD_SNVS: 1332,3653 1622,3692
  rectangle net VDD_SNVS: 1579,3552 1622,3692
  rectangle net V1_RTC: 1703,3552 1960.44,3617.37
  rectangle net V1_RTC: 1640,3552 1779,3645
  rectangle net 3V3: 840,3361 914,3445
  rectangle net NetD5_1: 112,1512 322,1676
  rectangle net NetD5_1: 229,1512 322,1832
  rectangle net NetR2_1: 254,897 313,942
  rectangle net 3V3: 1614,1116 1685,1254.01
  rectangle net NetC2_1: 240,1058 321,1212
  region net S-: 380,1844 380,1514 488,1514 488,1844
  region net GND: 332,1964 332,1749 366,1749 366,1964
  region net NetR28_1: 378,1911 378,1872 481,1872 481,1911
  region net GND: 332,1964 332,1924 481,1924 481,1964
  region net NetC28_1: 279,2020 279,1978 411,1978 411,2020
  region net GND: 219,1874 219,1840 357,1840 357,1874
  region net NetC28_1: 279,2001.5 279,1883 323.5,1883 323.5,2001.5
  rectangle net NetL5_2: 1098,824 1150,860.01
  rectangle net GND: 67,942 85,1044
  region net NetC78_2: 1635.5,972.02 1603.5,972.02 1603.5,844.01 1635.5,844.01
  region net VDD1_SNVS: 1757.5,877.01 1650.5,877.01 1650.5,829.01 1757.5,829.01
  region net NetC32_2: 1391.5,796.01 1320.5,796.01 1320.5,761.01 1391.5,761.01
  region net NetL5_2: 1108.5,860.01 991.5,860.01 991.5,793.02 1108.5,793.02
  region net V_RTC: 1960,988 1745,988 1745,887.02 1960,887.02
  region net VDD1_SNVS: 1885.5,877.01 1745,877.01 1745,829.01 1885.5,829.01
  region net RST_MCU: 1800.5,1102.01 1724.5,1102.01 1724.5,1028.01 1800.5,1028.01
  region net 3V3: 1841,1254.01 1614,1254.01 1614,1143 1841,1143
  region net 8V4: 20,988 20,940 59.08,940 59.08,988
  region net GND: 473,896 430,896 430,868 473,868
  region net NetR4_2: 512.5,940.4 485.58,940.4 485.58,866 512.5,866
  region net NetR2_1: 26,923 26,897 314,897 314,923
  region net NetC10_2: 313,969 313,995.27 173,995.27 173,969
  region net NetC11_2: 154,972.85 154,993.27 93.68,993.27 93.68,972.85
  region net GND: 376,1013 376,1044 67,1044 67,1013
  region net NetC2_1: 260,1299 72,1299 72,1058 260,1058
  rectangle net 8V4: 72,1333 540,1464
  region net GND: 451,1214 330,1214 330,868 451,868
  region net NetC2_2: 580,1067 580,1093 465,1093 465,1067
  region net S-: 703,1014 703,1042 464.68,1042 464.68,1014
  region net 3V3: 1953.5,660.01 1815.5,660.01 1815.5,629.01 1953.5,629.01
  pour cut-out: 50,1225 283,1225 283,1445 50,1445
  pour cut-out: 225,1740 474.32,1740 474.32,1503 225,1503

## Silkscreen, mask and mechanical layers (free items; w line width, h text height)
Top Overlay:
  text "RX1" at 1475.75,4726.73 h40 r90
  text "TX1" at 1538.63,4726.73 h40 r90
  text "RX1" at 689.75,4724.73 h40 r90
  text "TX1" at 752.63,4724.73 h40 r90
  text "12V" at 9.21,4612.51 h50
  text "5V" at 320.43,4612.51 h50
  text "GND" at 1540,4244.74 h40
  text "GND" at 1860.8,4244.74 h40
  text "3V3" at 1540,4144.74 h40
  text "3V3" at 1860.8,4144.74 h40
  text "SDA" at 1860.8,4044.74 h40
  text "SCL" at 1540,4044.07 h40
  text "MISO" at 1535.28,3945.74 h40
  text "SCL" at 1860.8,3944.74 h40
  text "JTAG" at 315.59,3845.45 h50 r90
  text "INT0" at 1860.8,3844.74 h40
  text "SDA" at 1540,3844.07 h40
  text "TRIG" at 1860.8,3744.74 h40
  text "CS" at 1540,3744.07 h40
  text "RX2" at 1769.73,3548.25 h40
  text "TX2" at 1773.01,3485.37 h40
  text "VBUS_1" at 361.55,3409.28 h50
  text "TX3" at 81.46,3217.2 h40
  text "QWIIC" at 1732.33,3160.95 h40 r90
  text "RX3" at 81.46,3154.33 h40
  text "3V3" at 631.91,3040.69 h40 r90
  text "GND" at 730.34,3040.69 h40 r90
  text "3V3" at 1274.13,3032.69 h40 r90
  text "GND" at 1372.55,3032.69 h40 r90
  text "3V" at 512,2984.41 h50
  text "3V" at 1154.21,2976.41 h50
  text "8V4" at 279.91,2847.69 h40 r90
  text "GND" at 378.34,2847.69 h40 r90
  text "5V" at 946.13,2847.69 h40 r90
  text "GND" at 1044.55,2847.69 h40 r90
  text "5V" at 1608.34,2847.69 h40 r90
  text "GND" at 1706.76,2847.69 h40 r90
  text "8V4" at 160,2791.41 h50
  text "5V" at 826.21,2791.51 h50
  text "5V" at 1488.43,2791.51 h50
  text "8V4" at 266.57,2655.39 h50 r270
  text "A10" at 543.26,2545.39 h40 r90
  text "GND" at 643.26,2545.39 h40 r90
  text "5V" at 743.26,2545.39 h40 r90
  text "A11" at 1251.25,2545.39 h40 r90
  text "GND" at 1351.25,2545.39 h40 r90
  text "5V" at 1451.25,2545.39 h40 r90
  text "5V" at 266.57,2495.58 h50 r270
  text "LHS_V" at 420,2484.43 h50
  text "RHS_V" at 1127.99,2484.43 h50
  text "B11" at 543.26,2240.39 h40 r90
  text "GND" at 643.26,2240.39 h40 r90
  text "8V4" at 743.26,2240.39 h40 r90
  text "D9" at 1251.25,2240.39 h40 r90
  text "GND" at 1351.25,2240.39 h40 r90
  text "8V4" at 1451.25,2240.39 h40 r90
  text "5V" at 87.49,2201.82 h50
  text "LHS_T" at 420,2179.43 h50
  text "RHS_T" at 1127.99,2179.43 h50
  text "8V4" at 87.49,2103.87 h50
  text "3V3" at 87.49,2005.87 h50
  text "10V" at 1630,1956 h50
  text "12V" at 87.49,1908.17 h50
  text "GND" at 1627.99,1855.54 h50
  text "S-" at 87.49,1810.25 h50
  text "G11" at 1647.8,1755.29 h50
  text "GND" at 87.49,1711.82 h50
  text "M11" at 1646.34,1656 h50
  text "ESC" at 1740,1543 h40
  text "IN" at 1882,1543 h40
  text "JTAG" at 1708.9,1467.41 h50
  text "8V4" at 898.99,1163.35 h50 r90
  text "RTC" at 1848.91,950.43 h50
  text "GND" at 1848.08,761.41 h50
  text "VBUS" at 1399.95,382.41 h50
  text "M12" at 769.3,339.95 h50 r90
  text "K10" at 869.3,339.95 h50 r90
  text "J12" at 969.3,339.95 h50 r90
  text "L13" at 1069.3,339.95 h50 r90
  text "J13" at 1169.3,339.95 h50 r90
  text "H13" at 1269.3,339.95 h50 r90
  text "5V" at 547.95,150.7 h50
  text "5V" at 1286.95,150.7 h50
  text "GND" at 547.95,50.7 h50
  text "GND" at 1286.95,50.7 h50
Bottom Overlay:
  lines w5: 1280,1029.02 1280,1152 1281,1153 ; 1369.5,1067 1516,1067 1561,1112 ; 1427,1029.02 1427,1044 1436.5,1053.51 1566.49,1053.51
  text "ASCII - v1.2" at 374.33,4857.24 h70
  text "GND" at 1886.54,3625.07 h40
  text "RTC" at 1886.54,3563.21 h40
  text "SDA" at 1886.54,3468.33 h40
  text "SCL" at 1886.54,3406.45 h40
  text "SCK" at 1883.27,3298.74 h40
  text "SOUT" at 1885.59,3199.74 h40
  text "SIN" at 1885.59,3099.74 h40
  text "3V3" at 595.4,3040.69 h40 r270
  text "GND" at 693.82,3040.69 h40 r270
  text "3V3" at 1237.61,3032.69 h40 r270
  text "GND" at 1336.03,3032.69 h40 r270
  text "PCS0" at 1885.59,2999.74 h40
  text "8V4" at 243.4,2847.69 h40 r270
  text "GND" at 341.82,2847.69 h40 r270
  text "5V" at 909.61,2847.69 h40 r270
  text "GND" at 1008.03,2847.69 h40 r270
  text "5V" at 1571.82,2847.69 h40 r270
  text "GND" at 1670.25,2847.69 h40 r270
  text "A10" at 506.74,2545.39 h40 r270
  text "GND" at 606.74,2545.39 h40 r270
  text "5V" at 706.74,2545.39 h40 r270
  text "A11" at 1214.73,2545.39 h40 r270
  text "GND" at 1314.73,2545.39 h40 r270
  text "5V" at 1414.73,2545.39 h40 r270
  text "B11" at 506.74,2239.8 h40 r270
  text "GND" at 606.74,2239.8 h40 r270
  text "8V4" at 706.74,2239.8 h40 r270
  text "D9" at 1213.82,2240.1 h40 r270
  text "GND" at 1313.82,2240.1 h40 r270
  text "8V4" at 1413.82,2240.1 h40 r270
Board Outline:
  lines w5: 984.25,4156.75 985,4156
  lines w10: 0,0 1968.5,0 1968.5,4921.26 0,4921.26 0,0

## Dimensions
1968.5,4921.26 to 1968.5,0 on Dimensions
0,4921.26 to 1968.5,4921.26 on Dimensions

## Text inside footprints (layer, text, board x,y; h text height)
C131: Top Overlay "+" at 896.3,4683.5 h25 r180
J8: Top Overlay "1" at 1292,259 h40; Top Overlay "16" at 638,259.51 h40; Top Overlay "3" at 1228,9 h40; Top Overlay "18" at 713,9 h40
J25: Bottom Overlay "1" at 1442,4768.02 h19.68 r180; Mechanical 13 "PCB Edge" at 1481.02,4887.06 h31.5 r180
U6: Top Overlay "MPU6050" at 901,1900 h40; Top Overlay "INT" at 1331,1655 h40 r90; Top Overlay "AD0" at 1231,1655 h40 r90; Top Overlay "XCL" at 1131,1655 h40 r90; Top Overlay "XDA" at 1031,1655 h40 r90; Top Overlay "SDA" at 931,1655 h40 r90; Top Overlay "SCL" at 831,1655 h40 r90; Top Overlay "GND" at 731,1655 h40 r90; Top Overlay "3V3" at 635.69,1655 h40 r90